# Altium PCB FPGA_Peripheral_Board.PcbDoc (part 5 of 5)
Units mm, origin at the board's own origin, x right, y up, seen from the top; angles counter-clockwise.
Board outline 78.8 x 69 mm, 4 copper layers (Top Layer, Int1 (GND), Int2 (PWR), Bottom Layer), stack 1.508 mm thick; 111 components, 280 nets, 1262 pads, 728 vias.
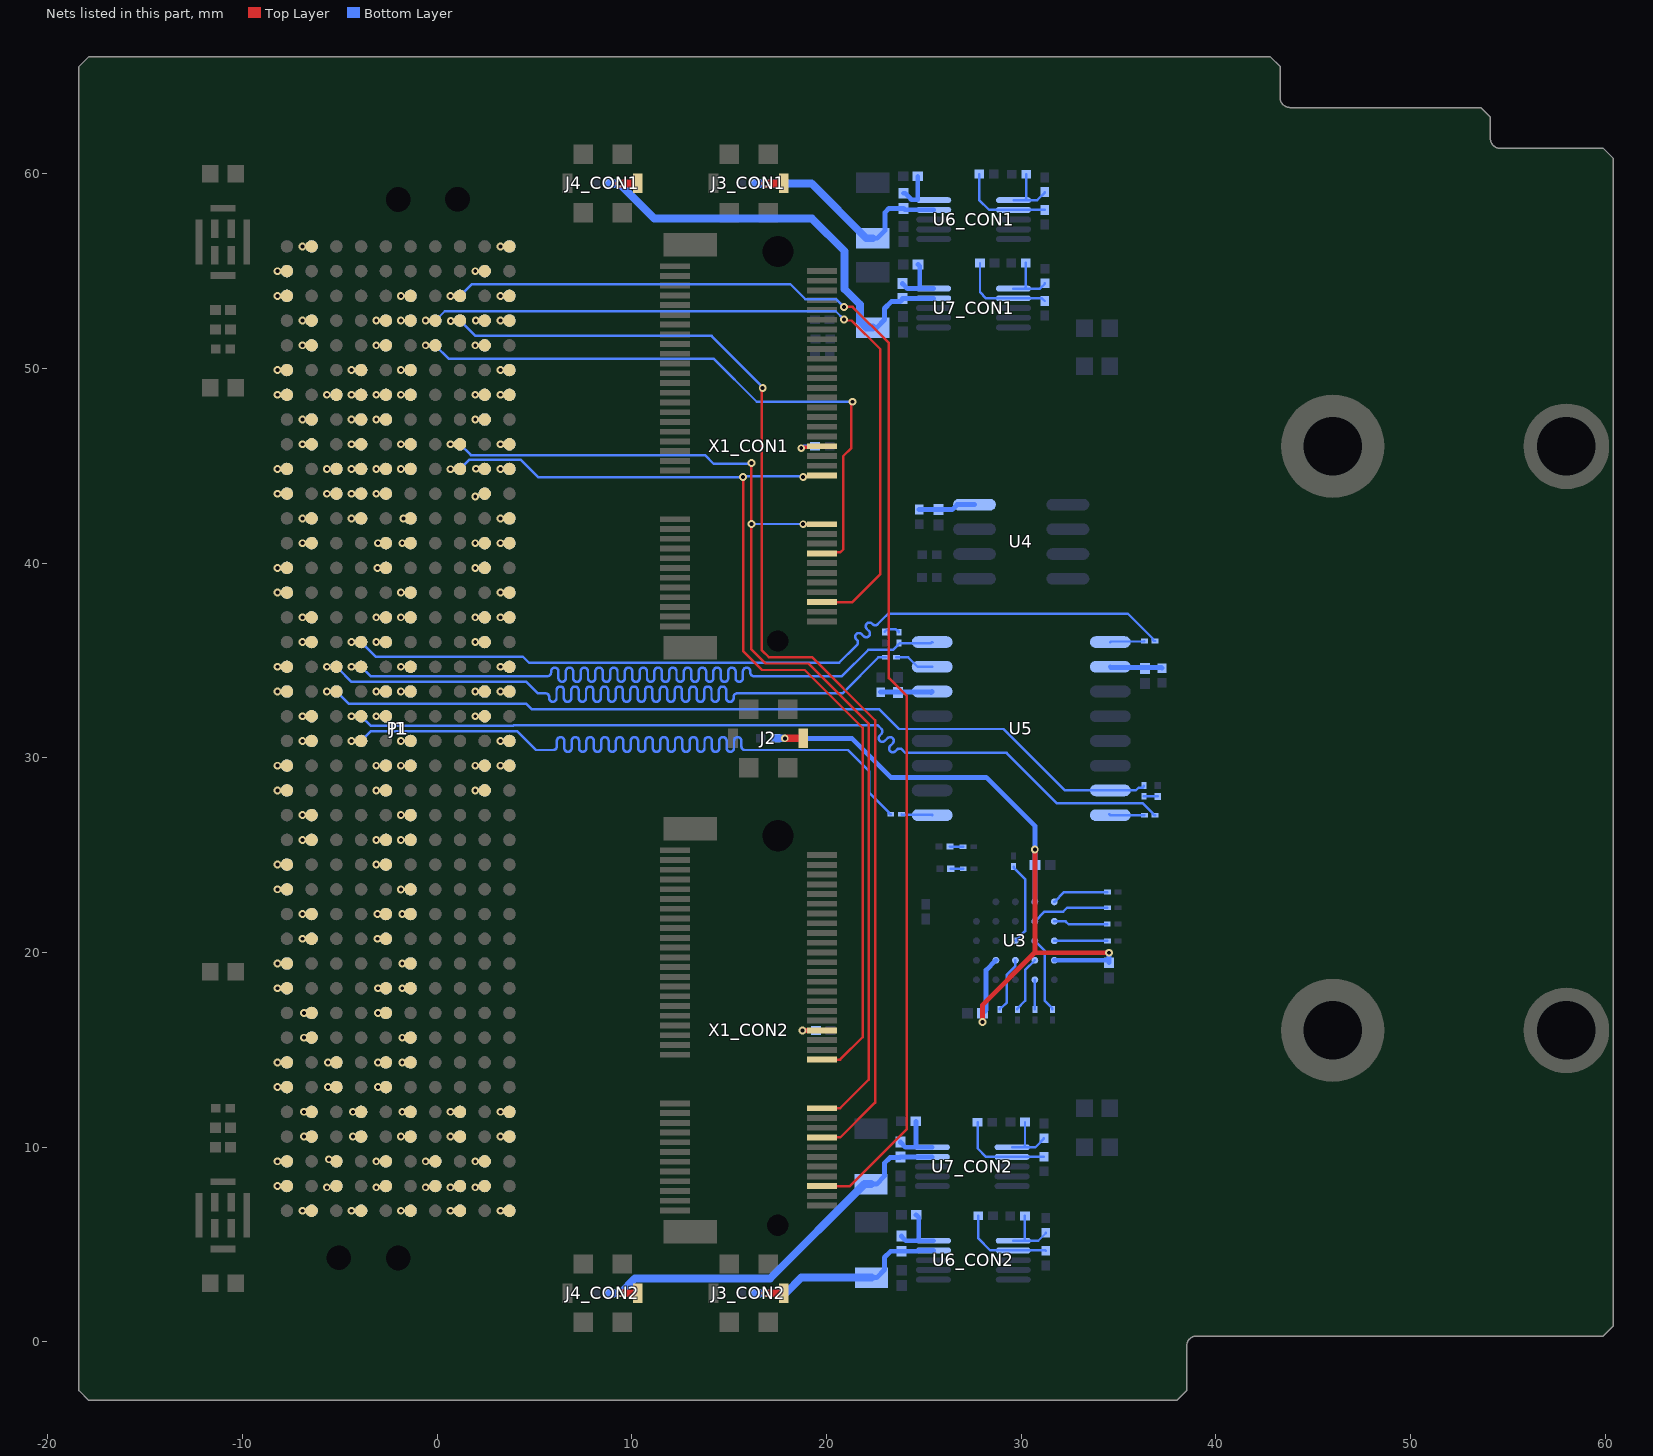
[diagram p6: the nets of this part, all layers, seen from the top]

## Via types
v1: diameter 0.4, hole 0.2, Top Layer to Bottom Layer, tented both sides, 713 vias
v2: diameter 3.5, hole 2.2, Top Layer to Bottom Layer, 11 vias
v3: diameter 5, hole 2.7, Top Layer to Bottom Layer, tented both sides, 2 vias
v4: diameter 3, hole 2.7, Top Layer to Bottom Layer, 1 vias
v5: diameter 3, hole 2.7, Top Layer to Bottom Layer, tented both sides, 1 vias

## Nets (pads, with @x,y where several pads share a name; then routed paths per layer and width w, separated by ;. In a path a pad name is that pad's centre, name@x,y a point inside that pad or via, vN(x,y) a via of type N, cw(c..) or ccw(c..) an arc to the next point about the centre after c; other vN are vias at no path point) (continued)
NetC5_2: C5.2 C6.2 C7.2 J2.1 R8.1 U3.B4 U3.D1 U3.E4 | length 40.5
  Top Layer w0.25: v1(28.016,16.426) 28.016,17.316 30.7,20 ; v1(30.7,25.295) 30.7,20 ; v1(34.502,19.99) 30.71,19.99 30.7,20
  Top Layer w0.4: v1(17.858,31) J2.1@18.8,31
  Bottom Layer w0.25: v1(17.858,31) 21.3,31 23.305,28.995 28.205,28.995 30.7,26.5 v1(30.7,25.295) U3.D1@30.7,22.6 ; v1(28.016,16.426) C5.2@28.016,16.881 ; C5.2@28.125,16.969 28.193,17.037 28.193,19.093 U3.B4@28.7,19.6 ; U3.E4@31.7,19.6 C7.2@34.502,19.6 ; C7.2@34.502,19.473 C7.2@34.502,19.6 ; v1(34.502,19.99) C7.2@34.502,19.6
  Bottom Layer w0.4: R8.1@17.375,31 v1(17.858,31)
NetC8_2: C8.2 R9.1 U4.8 | length 2.9
  Bottom Layer w0.25: R9.1@24.757,42.748 26.448,42.748 26.705,43.005 U4.8@27.6,43.005
NetC9_2: C9.2 R10.1 U5.2 | length 2.7
  Bottom Layer w0.25: U5.2@34.575,34.675 34.611,34.639 37.199,34.639 R10.1@37.235,34.604
NetC10_2: C10.2 R11.1 U5.14 | length 2.7
  Bottom Layer w0.25: R11.1@22.78,33.373 22.795,33.389 U5.14@25.409,33.389 ; U5.14@25.358,33.338 U5.14@25.409,33.389 ; U5.14@25.425,33.405 U5.14@25.409,33.389
NetC13_CON1_1: C13_CON1.1 J3_CON1.2 R13_CON1.2 R15_CON1.2 U6_CON1.9 | length 12.4
  Top Layer w0.4: v1(16.867,59.5) J3_CON1.2@17.8,59.5
  Bottom Layer w0.25: R15_CON1.2@22.373,56.686 22.607,56.686 23.007,57.086 23.007,58.014 23.21,58.216 C13_CON1.1@23.954,58.216 24.019,58.152 25.497,58.152 U6_CON1.9@25.506,58.143
  Bottom Layer w0.4: R13_CON1.2@16.375,59.5 v1(16.867,59.5) 19.234,59.5 22.048,56.686 R15_CON1.2@22.373,56.686
NetC13_CON1_2: C13_CON1.2 R17_CON1.1 U6_CON1.10 | length 2.1
  Bottom Layer w0.25: C13_CON1.2@23.954,58.996 24.042,58.996 24.308,58.73 24.308,58.721 24.366,58.662 24.685,58.662 R17_CON1.1@24.685,59.864
NetC13_CON2_1: C13_CON2.1 J3_CON2.2 R13_CON2.2 R15_CON2.2 U6_CON2.9 | length 11.3
  Top Layer w0.4: v1(16.854,2.5) J3_CON2.2@17.8,2.5
  Bottom Layer w0.25: R15_CON2.2@22.315,3.304 22.578,3.304 22.978,3.704 22.978,4.341 23.293,4.656 24.687,4.656 24.728,4.697 U6_CON2.9@25.492,4.697
  Bottom Layer w0.4: R13_CON2.2@16.375,2.5 v1(16.854,2.5) 17.9,2.5 18.704,3.304 R15_CON2.2@22.315,3.304
NetC13_CON2_2: C13_CON2.2 R17_CON2.1 U6_CON2.10 | length 3.2
  Bottom Layer w0.25: C13_CON2.2@23.847,5.436 23.847,5.416 24.066,5.197 U6_CON2.10@24.757,5.197 ; R17_CON2.1@24.602,6.524 24.609,6.524 24.734,6.399 24.734,5.22 U6_CON2.10@24.757,5.197 ; U6_CON2.10@25.492,5.197 U6_CON2.10@24.757,5.197
NetC14_CON1_1: C14_CON1.1 J4_CON1.2 R14_CON1.2 R16_CON1.2 U7_CON1.9 | length 23.3
  Top Layer w0.4: v1(9.355,59.5) J4_CON1.2@10.3,59.5
  Bottom Layer w0.25: R16_CON1.2@22.374,52.097 22.576,52.097 22.976,52.497 22.976,53.076 23.33,53.43 23.772,53.43 23.907,53.565 C14_CON1.1@23.907,53.585 23.915,53.592 25.492,53.592 U7_CON1.9@25.5,53.6
  Bottom Layer w0.4: R14_CON1.2@8.875,59.5 v1(9.355,59.5) 11.155,57.7 19.246,57.7 20.93,56.016 20.93,54.07 21.724,53.276 21.724,52.422 22.049,52.097 R16_CON1.2@22.374,52.097
NetC14_CON1_2: C14_CON1.2 R18_CON1.1 U7_CON1.10 | length 3
  Bottom Layer w0.25: C14_CON1.2@23.907,54.365 23.907,54.345 24.152,54.1 U7_CON1.10@24.81,54.1 ; R18_CON1.1@24.698,55.342 24.786,55.254 24.786,54.123 U7_CON1.10@24.81,54.1 ; U7_CON1.10@25.5,54.1 U7_CON1.10@24.81,54.1
NetC14_CON2_1: C14_CON2.1 J4_CON2.2 R14_CON2.2 R16_CON2.2 U7_CON2.9 | length 20.8
  Top Layer w0.4: v1(9.4,2.5) J4_CON2.2@10.3,2.5
  Bottom Layer w0.25: R16_CON2.2@22.278,8.107 22.575,8.107 22.975,8.507 22.975,9.181 23.262,9.468 23.782,9.468 23.809,9.495 25.426,9.495 U7_CON2.9@25.432,9.5
  Bottom Layer w0.4: R14_CON2.2@8.875,2.5 v1(9.4,2.5) 10.16,3.26 17.107,3.26 21.953,8.107 R16_CON2.2@22.278,8.107
NetC14_CON2_2: C14_CON2.2 R18_CON2.1 U7_CON2.10 | length 3.1
  Bottom Layer w0.25: C14_CON2.2@23.803,10.269 23.803,10.249 24.052,10 U7_CON2.10@25.432,10 ; R18_CON2.1@24.589,11.326 24.589,10.077 U7_CON2.10@24.653,10.013
NetC23_1: C23.1 R39.2 | length 0.7
  Bottom Layer w0.125: C23.1@26.338,25.443 26.343,25.438 27.009,25.438 R39.2@27.014,25.433
NetC24_1: C24.1 R40.2 | length 0.6
  Bottom Layer w0.125: C24.1@26.38,24.3 R40.2@27.025,24.3
NetC25_1: C25.1 R42.2 | length 0.7
  Bottom Layer w0.125: R42.2@36.3,28.025 36.302,28.023 37.01,28.023 C25.1@37.011,28.021
NetC26_1: C26.1 R43.2 | length 0.9
  Bottom Layer w0.125: C26.1@22.997,36.461 22.997,36.481 23.095,36.579 23.147,36.579 23.168,36.6 23.564,36.6 23.602,36.562 23.652,36.562 23.715,36.499 R43.2@23.715,36.449
NetJ1_A2: J1.A2 P1.A2
  other v1: -8.2,8.005
NetJ1_A3: J1.A3 P1.A3
  other v1: -8.2,9.275
NetJ1_A6: J1.A6 P1.A6
  other v1: -8.2,13.085
NetJ1_A7: J1.A7 P1.A7
  other v1: -8.2,14.355
NetJ1_A10: J1.A10 P1.A10
  other v1: -8.2,18.165
NetJ1_A11: J1.A11 P1.A11
  other v1: -8.2,19.435
NetJ1_A14: J1.A14 P1.A14
  other v1: -8.2,23.245
NetJ1_A15: J1.A15 P1.A15
  other v1: -8.2,24.515
NetJ1_A18: J1.A18 P1.A18
  other v1: -8.2,28.325
NetJ1_A19: J1.A19 P1.A19
  other v1: -8.2,29.595
NetJ1_A22: J1.A22 P1.A22
  other v1: -8.2,33.405
NetJ1_A23: J1.A23 P1.A23
  other v1: -8.2,34.675
NetJ1_A26: J1.A26 P1.A26
  other v1: -8.2,38.485
NetJ1_A27: J1.A27 P1.A27
  other v1: -8.2,39.755
NetJ1_A30: J1.A30 P1.A30
  other v1: -8.2,43.565
NetJ1_A31: J1.A31 P1.A31
  other v1: -8.2,44.835
NetJ1_A34: J1.A34 P1.A34
  other v1: -8.2,48.645
NetJ1_A35: J1.A35 P1.A35
  other v1: -8.2,49.915
NetJ1_A38: J1.A38 P1.A38
  other v1: -8.2,53.725
NetJ1_A39: J1.A39 P1.A39
  other v1: -8.2,54.995
NetJ1_B1: J1.B1 P1.B1
  other v1: -6.92,6.735
NetJ1_B4: J1.B4 P1.B4
  other v1: -6.837,10.545
NetJ1_B5: J1.B5 P1.B5
  other v1: -6.837,11.815
NetJ1_B8: J1.B8 P1.B8
  other v1: -6.837,15.625
NetJ1_B9: J1.B9 P1.B9
  other v1: -6.837,16.895
NetJ1_B12: J1.B12 P1.B12
  other v1: -6.92,20.705
NetJ1_B13: J1.B13 P1.B13
  other v1: -6.92,21.975
NetJ1_B16: J1.B16 P1.B16
  other v1: -6.92,25.785
NetJ1_B17: J1.B17 P1.B17
  other v1: -6.92,27.055
NetJ1_B20: J1.B20 P1.B20
  other v1: -6.92,30.865
NetJ1_B21: J1.B21 P1.B21
  other v1: -6.92,32.135
NetJ1_B24: J1.B24 P1.B24
  other v1: -6.92,35.945
NetJ1_B25: J1.B25 P1.B25
  other v1: -6.92,37.215
NetJ1_B28: J1.B28 P1.B28
  other v1: -6.92,41.025
NetJ1_B29: J1.B29 P1.B29
  other v1: -6.92,42.295
NetJ1_B32: J1.B32 P1.B32
  other v1: -6.92,46.105
NetJ1_B33: J1.B33 P1.B33
  other v1: -6.92,47.375
NetJ1_B36: J1.B36 P1.B36
  other v1: -6.92,51.185
NetJ1_B37: J1.B37 P1.B37
  other v1: -6.92,52.455
NetJ1_B40: J1.B40 P1.B40
  other v1: -6.92,56.265
NetJ1_C2: J1.C2 P1.C2
  other v1: -5.665,7.938
NetJ1_C3: J1.C3 P1.C3
  other v1: -5.564,9.376
NetJ1_C6: J1.C6 P1.C6
  other v1: -5.6,13.085
NetJ1_C7: J1.C7 P1.C7
  other v1: -5.6,14.355
NetJ1_C30: J1.C30 P1.C30
  other v1: -5.665,43.565
NetJ1_C31: J1.C31 P1.C31
  other v1: -5.665,44.835
NetJ1_C34: J1.C34 P1.C34
  other v1: -5.665,48.645
NetJ1_D1: J1.D1 P1.D1
  other v1: -4.395,6.735
NetJ1_D4: J1.D4 P1.D4
  other v1: -4.33,10.545
NetJ1_D5: J1.D5 P1.D5
  other v1: -4.33,11.815
NetJ1_D29: J1.D29 P1.D29
  other v1: -4.395,42.295
NetJ1_D30: J1.D30 P1.D30
  other v1: -4.395,43.565
NetJ1_D31: J1.D31 P1.D31
  other v1: -4.395,44.835
NetJ1_D32: J1.D32 P1.D32
  other v1: -4.395,46.105
NetJ1_D33: J1.D33 P1.D33
  other v1: -4.395,47.375
NetJ1_D34: J1.D34 P1.D34
  other v1: -4.395,48.645
NetJ1_D35: J1.D35 P1.D35
  other v1: -4.395,49.915
NetJ1_E2: J1.E2 P1.E2
  other v1: -3.126,7.938
NetJ1_E3: J1.E3 P1.E3
  other v1: -3.126,9.275
NetJ1_E6: J1.E6 P1.E6
  other v1: -3.037,13.085
NetJ1_E7: J1.E7 P1.E7
  other v1: -3.037,14.355
NetJ1_E9: J1.E9 P1.E9
  other v1: -3.037,16.895
NetJ1_E10: J1.E10 P1.E10
  other v1: -3.037,18.165
NetJ1_E12: J1.E12 P1.E12
  other v1: -3.06,20.705
NetJ1_E13: J1.E13 P1.E13
  other v1: -3.06,21.975
NetJ1_E15: J1.E15 P1.E15
  other v1: -3.126,24.515
NetJ1_E16: J1.E16 P1.E16
  other v1: -3.126,25.785
NetJ1_E18: J1.E18 P1.E18
  other v1: -3.126,28.325
NetJ1_E19: J1.E19 P1.E19
  other v1: -3.126,29.595
NetJ1_E21: J1.E21 P1.E21
  other v1: -3.126,32.135
NetJ1_E22: J1.E22 P1.E22
  other v1: -3.126,33.405
NetJ1_E24: J1.E24 P1.E24
  other v1: -3.126,35.945
NetJ1_E25: J1.E25 P1.E25
  other v1: -3.126,37.215
NetJ1_E27: J1.E27 P1.E27
  other v1: -3.06,39.755
NetJ1_E28: J1.E28 P1.E28
  other v1: -3.037,41.025
NetJ1_E30: J1.E30 P1.E30
  other v1: -3.126,43.565
NetJ1_E31: J1.E31 P1.E31
  other v1: -3.126,44.835
NetJ1_E33: J1.E33 P1.E33
  other v1: -3.126,47.375
NetJ1_E34: J1.E34 P1.E34
  other v1: -3.126,48.645
NetJ1_E36: J1.E36 P1.E36
  other v1: -3.126,51.185
NetJ1_E37: J1.E37 P1.E37
  other v1: -3.126,52.455
NetJ1_F1: J1.F1 P1.F1
  other v1: -1.865,6.735
NetJ1_F4: J1.F4 P1.F4
  other v1: -1.865,10.545
NetJ1_F5: J1.F5 P1.F5
  other v1: -1.79,11.815
NetJ1_F7: J1.F7 P1.F7
  other v1: -1.79,14.355
NetJ1_F8: J1.F8 P1.F8
  other v1: -1.79,15.625
NetJ1_F10: J1.F10 P1.F10
  other v1: -1.79,18.165
NetJ1_F11: J1.F11 P1.F11
  other v1: -1.79,19.435
NetJ1_F13: J1.F13 P1.F13
  other v1: -1.79,21.975
NetJ1_F14: J1.F14 P1.F14
  other v1: -1.865,23.237
NetJ1_F16: J1.F16 P1.F16
  other v1: -1.865,25.785
NetJ1_F17: J1.F17 P1.F17
  other v1: -1.865,27.055
NetJ1_F19: J1.F19 P1.F19
  other v1: -1.865,29.595
NetJ1_F20: J1.F20 P1.F20
  other v1: -1.865,30.865
NetJ1_F22: J1.F22 P1.F22
  other v1: -1.865,33.405
NetJ1_F23: J1.F23 P1.F23
  other v1: -1.865,34.675
NetJ1_F25: J1.F25 P1.F25
  other v1: -1.865,37.215
NetJ1_F26: J1.F26 P1.F26
  other v1: -1.865,38.485
NetJ1_F28: J1.F28 P1.F28
  other v1: -1.79,41.025
NetJ1_F29: J1.F29 P1.F29
  other v1: -1.737,42.295
NetJ1_F31: J1.F31 P1.F31
  other v1: -1.865,44.835
NetJ1_F32: J1.F32 P1.F32
  other v1: -1.865,46.105
NetJ1_F34: J1.F34 P1.F34
  other v1: -1.865,48.645
NetJ1_F35: J1.F35 P1.F35
  other v1: -1.865,49.915
NetJ1_F37: J1.F37 P1.F37
  other v1: -1.865,52.455
NetJ1_F38: J1.F38 P1.F38
  other v1: -1.865,53.725
NetJ1_G2: J1.G2 P1.G2
  other v1: -0.59,7.938
NetJ1_G3: J1.G3 P1.G3
  other v1: -0.59,9.275
NetJ1_H1: J1.H1 P1.H1
  other v1: 0.68,6.735
NetJ1_H2: J1.H2 P1.H2
  other v1: 0.68,7.938
NetJ1_H4: J1.H4 P1.H4
  other v1: 0.68,10.545
NetJ1_H5: J1.H5 P1.H5
  other v1: 0.68,11.815
NetJ1_J2: J1.J2 P1.J2
  other v1: 1.96,7.938
NetJ1_J3: J1.J3 P1.J3
  other v1: 1.96,9.275
NetJ1_J18: J1.J18 P1.J18
  other v1: 1.96,28.325
NetJ1_J19: J1.J19 P1.J19
  other v1: 1.96,29.595
NetJ1_J21: J1.J21 P1.J21
  other v1: 1.96,32.135
NetJ1_J22: J1.J22 P1.J22
  other v1: 1.96,33.405
NetJ1_J24: J1.J24 P1.J24
  other v1: 1.96,35.945
NetJ1_J25: J1.J25 P1.J25
  other v1: 1.96,37.215
NetJ1_J27: J1.J27 P1.J27
  other v1: 1.96,39.755
NetJ1_J28: J1.J28 P1.J28
  other v1: 1.96,41.025
NetJ1_J30: J1.J30 P1.J30
  other v1: 1.96,43.422
NetJ1_J31: J1.J31 P1.J31
  other v1: 1.989,44.844
NetJ1_J33: J1.J33 P1.J33
  other v1: 1.96,47.375
NetJ1_J34: J1.J34 P1.J34
  other v1: 1.96,48.645
NetJ1_J36: J1.J36 P1.J36
  other v1: 1.96,51.185
NetJ1_J37: J1.J37 P1.J37
  other v1: 1.985,52.458
NetJ1_J39: J1.J39 P1.J39
  other v1: 1.96,54.995
NetJ1_K1: J1.K1 P1.K1
  other v1: 3.25,6.735
NetJ1_K4: J1.K4 P1.K4
  other v1: 3.25,10.545
NetJ1_K5: J1.K5 P1.K5
  other v1: 3.25,11.815
NetJ1_K19: J1.K19 P1.K19
  other v1: 3.25,29.595
NetJ1_K20: J1.K20 P1.K20
  other v1: 3.25,30.865
NetJ1_K22: J1.K22 P1.K22
  other v1: 3.25,33.405
NetJ1_K23: J1.K23 P1.K23
  other v1: 3.25,34.675
NetJ1_K25: J1.K25 P1.K25
  other v1: 3.25,37.215
NetJ1_K26: J1.K26 P1.K26
  other v1: 3.25,38.485
NetJ1_K28: J1.K28 P1.K28
  other v1: 3.25,41.025
NetJ1_K29: J1.K29 P1.K29
  other v1: 3.25,42.295
NetJ1_K31: J1.K31 P1.K31
  other v1: 3.25,44.835
NetJ1_K32: J1.K32 P1.K32
  other v1: 3.25,46.105
NetJ1_K34: J1.K34 P1.K34
  other v1: 3.25,48.645
NetJ1_K35: J1.K35 P1.K35
  other v1: 3.25,49.915
NetJ1_K37: J1.K37 P1.K37
  other v1: 3.25,52.455
NetJ1_K38: J1.K38 P1.K38
  other v1: 3.25,53.725
NetJ1_K40: J1.K40 P1.K40
  other v1: 3.25,56.265
NetR12_CON1_1: R12_CON1.1 X1_CON1.38 | length 1.9
  Top Layer w0.2: v1(18.7,45.903) 18.754,45.903 18.801,45.95 19.725,45.95 X1_CON1.38@19.775,46
  Bottom Layer w0.2: v1(18.7,45.903) 18.754,45.903 18.851,46 R12_CON1.1@19.409,46
NetR12_CON2_1: R12_CON2.1 X1_CON2.38 | length 1.7
  Top Layer w0.25: v1(18.762,16) X1_CON2.38@19.775,16
  Bottom Layer w0.25: v1(18.762,16) R12_CON2.1@19.455,16
NetR19_CON1_2: R19_CON1.2 R23.2 U6_CON1.2 | length 4.9
  Bottom Layer w0.125: R19_CON1.2@27.84,59.982 27.84,58.658 28.355,58.143 U6_CON1.2@29.606,58.143 31.208,58.143 R23.2@31.214,58.137
NetR19_CON2_2: R19_CON2.2 R27.2 U6_CON2.2 | length 4.9
  Bottom Layer w0.125: R19_CON2.2@27.797,6.476 27.797,5.311 28.412,4.697 U6_CON2.2@29.592,4.697 31.243,4.697 R27.2@31.262,4.678
NetR20_CON1_2: R20_CON1.2 R24.2 U6_CON1.1 | length 3.2
  Bottom Layer w0.125: U6_CON1.1@29.606,58.643 U6_CON1.1@30.178,58.643 ; R20_CON1.2@30.259,59.976 30.259,58.723 U6_CON1.1@30.178,58.643 ; R24.2@31.214,59.058 31.214,59.033 30.823,58.643 U6_CON1.1@30.178,58.643
NetR20_CON2_2: R20_CON2.2 R28.2 U6_CON2.1 | length 3.2
  Bottom Layer w0.125: U6_CON2.1@29.592,5.197 U6_CON2.1@30.111,5.197 ; R20_CON2.2@30.192,6.472 30.192,5.278 U6_CON2.1@30.111,5.197 ; R28.2@31.262,5.608 31.262,5.583 30.875,5.197 U6_CON2.1@30.111,5.197
NetR21_CON1_2: R21_CON1.2 R25.2 U7_CON1.2 | length 5
  Bottom Layer w0.125: R21_CON1.2@27.881,55.413 27.881,53.919 28.2,53.6 U7_CON1.2@29.6,53.6 31.068,53.6 R25.2@31.206,53.462
NetR21_CON2_2: R21_CON2.2 R29.2 U7_CON2.2 | length 4.9
  Bottom Layer w0.125: R21_CON2.2@27.758,11.287 27.758,9.942 28.2,9.5 U7_CON2.2@29.532,9.5 31.154,9.5 R29.2@31.166,9.512
NetR22_CON1_2: R22_CON1.2 R26.2 U7_CON1.1 | length 3.1
  Bottom Layer w0.125: U7_CON1.1@29.6,54.1 U7_CON1.1@30.153,54.1 ; R22_CON1.2@30.234,55.42 30.234,54.181 U7_CON1.1@30.153,54.1 ; R26.2@31.215,54.375 31.215,54.35 30.965,54.1 U7_CON1.1@30.153,54.1
NetR22_CON2_2: R22_CON2.2 R30.2 U7_CON2.1 | length 3.2
  Bottom Layer w0.125: U7_CON2.1@29.532,10 U7_CON2.1@30.113,10 ; R22_CON2.2@30.194,11.294 30.194,10.081 U7_CON2.1@30.113,10 ; R30.2@31.166,10.465 31.166,10.44 30.726,10 U7_CON2.1@30.113,10
NetR31_2: R31.2 U3.D3 | length 3.9
  Bottom Layer w0.125: U3.D3@30.7,20.6 31.215,20.085 31.215,17.51 31.6,17.125 R31.2@31.6,17.075
NetR33_2: R33.2 U3.D2 | length 4
  Bottom Layer w0.125: U3.D2@30.7,21.6 31.2,22.1 32.16,22.1 32.36,22.3 R33.2@34.425,22.3
NetR34_2: R34.2 U3.C4 | length 2.9
  Bottom Layer w0.125: R34.2@28.9,17.075 28.9,17.125 28.962,17.187 29.012,17.187 29.263,17.437 29.263,18.867 29.7,19.304 U3.C4@29.7,19.6
NetR35_2: R35.2 U3.D4 | length 2.9
  Bottom Layer w0.125: R35.2@29.8,17.075 29.8,17.125 30.2,17.525 30.2,19.1 U3.D4@30.7,19.6
NetR36_2: R36.2 U3.D5 | length 1.5
  Bottom Layer w0.125: R36.2@30.7,17.075 U3.D5@30.7,18.6
NetR37_2: R37.2 U3.E3 | length 2.7
  Bottom Layer w0.125: U3.E3@31.7,20.6 R37.2@34.425,20.6
NetR38_2: R38.2 U3.E2 | length 2.8
  Bottom Layer w0.125: U3.E2@31.7,21.6 32.282,21.6 32.434,21.448 34.408,21.448 R38.2@34.42,21.461
NetR41_2: R41.2 U3.E1 | length 2.9
  Bottom Layer w0.125: U3.E1@31.7,22.6 32.2,23.1 R41.2@34.425,23.1
NetR44_1: R44.1 U5.15 | length 2.1
  Bottom Layer w0.125: R44.1@23.586,35.162 24.188,35.162 24.675,34.675 U5.15@25.425,34.675 U5.15@25.432,34.668
NetR45_1: R45.1 U5.8 | length 1.8
  Bottom Layer w0.125: U5.8@34.525,27.105 U5.8@34.575,27.055 34.576,27.054 R45.1@36.325,27.052 R45.1@36.325,27.052
NetR46_1: R46.1 U5.9 | length 1.6
  Bottom Layer w0.125: R46.1@23.85,27.1 23.872,27.077 25.403,27.077 U5.9@25.425,27.055 U5.9@25.438,27.068
NetR47_1: R47.1 U5.1 | length 1.8
  Bottom Layer w0.125: U5.1@34.575,35.945 34.602,35.972 36.297,35.972 R47.1@36.325,36
NetR48_2: R48.2 U3.C3 | length 4.3
  Bottom Layer w0.125: R48.2@29.607,24.414 29.607,24.364 30.2,23.771 30.2,21.1 U3.C3@29.7,20.6
nLED1_CON1: J1.G37 P1.G37 X1_CON1.6 | length 39
  Top Layer w0.125: X1_CON1.6@19.775,38 21.325,38 22.764,39.438 22.764,50.986 21.29,52.46 20.95,52.46 v1(20.903,52.507)
  Bottom Layer w0.125: P1.G37@-0.095,52.455 0.387,52.937 20.472,52.937 v1(20.903,52.507)
  other v1: -0.59,52.455
nLED1_CON2: J1.H38 P1.H38 X1_CON2.6 | length 69.9
  Top Layer w0.125: X1_CON2.6@19.775,8 21.2,8 24.129,10.929 24.129,33.171 23.204,34.096 23.204,51.296 21.342,53.158 v1(20.892,53.158)
  Bottom Layer w0.125: P1.H38@1.175,53.725 1.782,54.332 18.136,54.332 18.91,53.557 20.492,53.557 v1(20.892,53.158)
  other v1: 0.68,53.725
nLED2_CON1: J1.G36 P1.G36 X1_CON1.16 | length 31.6
  Top Layer w0.125: X1_CON1.16@19.775,40.5 19.822,40.547 20.701,40.547 20.858,40.704 20.858,45.495 21.279,45.916 21.279,48.234 v1(21.331,48.286)
  Bottom Layer w0.125: P1.G36@-0.095,51.185 0.59,50.5 14.2,50.5 16.414,48.286 v1(21.331,48.286)
  other v1: -0.59,51.185
nLED2_CON2: J1.H37 P1.H37 X1_CON2.16 | length 60.9
  Top Layer w0.125: v1(16.719,48.993) 16.683,48.956 16.683,35.519 17.031,35.171 19.252,35.171 22.496,31.927 22.496,12.288 20.707,10.5 X1_CON2.16@19.775,10.5
  Bottom Layer w0.125: P1.H37@1.175,52.455 1.962,51.667 14.099,51.667 16.719,49.047 v1(16.719,48.993)
  other v1: 0.7,52.435
QSPI_IO0: J1.C23 P1.C23 R44.2 | length 45.1
  Bottom Layer w0.125: P1.C23@-5.175,34.675 -5.175,34.575 -5.075,34.575 -4.4,33.9 4.585,33.9 5.148,33.338 5.174,33.312 5.563,33.312 cw(c5.563,33.122) 5.752,33.122 5.752,33.064 ccw(c5.942,33.064) 5.942,32.874 ccw(c5.942,33.064) 6.131,33.064 6.131,33.472 cw(c6.321,33.472) 6.321,33.661 cw(c6.321,33.472) 6.51,33.472 6.51,33.064 ccw(c6.7,33.064) 6.7,32.874 ccw(c6.7,33.064) 6.889,33.064 6.889,33.472 cw(c7.079,33.472) 7.079,33.661 cw(c7.079,33.472) 7.268,33.472 7.268,33.064 ccw(c7.458,33.064) 7.458,32.874 ; 7.458,32.874 ccw(c7.458,33.064) 7.647,33.064 7.647,33.472 cw(c7.837,33.472) 7.837,33.661 cw(c7.837,33.472) 8.026,33.472 8.026,33.064 ccw(c8.216,33.064) 8.216,32.874 ccw(c8.216,33.064) 8.405,33.064 8.405,33.472 cw(c8.595,33.472) 8.595,33.661 cw(c8.595,33.472) 8.784,33.472 8.784,33.064 ccw(c8.974,33.064) 8.974,32.874 ccw(c8.974,33.064) 9.163,33.064 9.163,33.472 cw(c9.353,33.472) 9.353,33.661 cw(c9.353,33.472) 9.542,33.472 9.542,33.064 ccw(c9.732,33.064) 9.732,32.874 ccw(c9.732,33.064) 9.921,33.064 9.921,33.472 cw(c10.111,33.472) 10.111,33.661 cw(c10.111,33.472) 10.3,33.472 10.3,33.064 ccw(c10.49,33.064) 10.49,32.874 ccw(c10.49,33.064) 10.679,33.064 10.679,33.472 cw(c10.869,33.472) 10.869,33.661 cw(c10.869,33.472) 11.058,33.472 11.058,33.064 ccw(c11.248,33.064) 11.248,32.874 ccw(c11.248,33.064) 11.437,33.064 11.437,33.472 cw(c11.627,33.472) 11.627,33.661 cw(c11.627,33.472) 11.816,33.472 11.816,33.064 ccw(c12.006,33.064) 12.006,32.874 ccw(c12.006,33.064) 12.195,33.064 12.195,33.472 cw(c12.385,33.472) 12.385,33.661 cw(c12.385,33.472) 12.574,33.472 12.574,33.064 ccw(c12.764,33.064) 12.764,32.874 ccw(c12.764,33.064) 12.953,33.064 12.953,33.472 cw(c13.143,33.472) 13.143,33.661 cw(c13.143,33.472) 13.332,33.472 13.332,33.064 ccw(c13.522,33.064) 13.522,32.874 ccw(c13.522,33.064) 13.711,33.064 13.711,33.472 cw(c13.901,33.472) 13.901,33.661 cw(c13.901,33.472) 14.09,33.472 14.09,33.064 ccw(c14.28,33.064) 14.28,32.874 ccw(c14.28,33.064) 14.469,33.064 14.469,33.472 cw(c14.659,33.472) 14.659,33.661 cw(c14.659,33.472) 14.848,33.472 14.848,33.064 ccw(c15.038,33.064) 15.038,32.874 ccw(c15.038,33.064) 15.227,33.064 15.227,33.122 cw(c15.417,33.122) 15.417,33.312 15.479,33.312 20.812,33.312 22.662,35.162 R44.2@23.036,35.162
  other v1: -5.665,34.675
QSPI_IO1: J1.D21 P1.D21 R45.2 | length 44.4
  Bottom Layer w0.125: P1.D21@-3.905,32.135 -3.423,31.652 3.915,31.652 3.927,31.664 22.495,31.664 22.636,31.664 22.811,31.489 cw(c22.677,31.355) 22.811,31.221 22.733,31.144 ccw(c22.867,31.01) 22.733,30.876 ccw(c22.867,31.01) 23.001,30.876 23.132,31.007 cw(c23.266,30.873) 23.4,31.007 cw(c23.266,30.873) 23.4,30.739 23.269,30.608 ccw(c23.403,30.474) 23.269,30.34 ccw(c23.403,30.474) 23.537,30.34 23.615,30.417 cw(c23.749,30.283) 23.883,30.417 24.044,30.256 24.051,30.249 24.125,30.249 29.251,30.249 31.84,27.66 36.248,27.66 36.663,27.245 36.763,27.145 36.763,27.115 36.825,27.052 R45.2@36.875,27.052
  other v1: -4.395,32.135
QSPI_IO2: J1.D20 P1.D20 R46.2 | length 45.1
  Bottom Layer w0.125: P1.D20@-3.905,30.865 -3.402,31.368 4.101,31.368 5.068,30.4 5.9,30.4 5.963,30.4 ccw(c5.963,30.589) 6.152,30.589 6.152,30.875 cw(c6.342,30.875) 6.342,31.065 cw(c6.342,30.875) 6.531,30.875 6.531,30.499 ccw(c6.721,30.499) 6.721,30.31 ccw(c6.721,30.499) 6.91,30.499 6.91,30.875 cw(c7.1,30.875) 7.1,31.065 cw(c7.1,30.875) 7.289,30.875 7.289,30.499 ccw(c7.479,30.499) 7.479,30.31 ccw(c7.479,30.499) 7.668,30.499 7.668,30.875 cw(c7.858,30.875) 7.858,31.065 cw(c7.858,30.875) 8.047,30.875 8.047,30.499 ccw(c8.237,30.499) 8.237,30.31 ccw(c8.237,30.499) 8.426,30.499 8.426,30.875 cw(c8.616,30.875) 8.616,31.065 cw(c8.616,30.875) 8.805,30.875 8.805,30.499 ccw(c8.995,30.499) 8.995,30.31 ccw(c8.995,30.499) 9.184,30.499 9.184,30.875 cw(c9.374,30.875) 9.374,31.065 cw(c9.374,30.875) 9.563,30.875 9.563,30.499 ccw(c9.753,30.499) 9.753,30.31 ccw(c9.753,30.499) 9.942,30.499 9.942,30.875 cw(c10.132,30.875) 10.132,31.065 cw(c10.132,30.875) 10.321,30.875 10.321,30.499 ccw(c10.511,30.499) 10.511,30.31 ccw(c10.511,30.499) 10.7,30.499 10.7,30.875 cw(c10.89,30.875) 10.89,31.065 cw(c10.89,30.875) 11.079,30.875 11.079,30.499 ccw(c11.269,30.499) 11.269,30.31 ccw(c11.269,30.499) 11.458,30.499 11.458,30.875 cw(c11.648,30.875) 11.648,31.065 cw(c11.648,30.875) 11.837,30.875 11.837,30.499 ccw(c12.027,30.499) 12.027,30.31 ccw(c12.027,30.499) 12.216,30.499 12.216,30.875 cw(c12.406,30.875) 12.406,31.065 cw(c12.406,30.875) 12.595,30.875 12.595,30.499 ccw(c12.785,30.499) 12.785,30.31 ccw(c12.785,30.499) 12.974,30.499 12.974,30.875 cw(c13.164,30.875) 13.164,31.065 cw(c13.164,30.875) 13.353,30.875 13.353,30.499 ccw(c13.543,30.499) 13.543,30.31 ccw(c13.543,30.499) 13.732,30.499 13.732,30.875 cw(c13.922,30.875) 13.922,31.065 cw(c13.922,30.875) 14.111,30.875 14.111,30.499 ccw(c14.301,30.499) 14.301,30.31 ccw(c14.301,30.499) 14.49,30.499 14.49,30.875 cw(c14.68,30.875) 14.68,31.065 cw(c14.68,30.875) 14.869,30.875 14.869,30.499 ccw(c15.059,30.499) 15.059,30.31 ccw(c15.059,30.499) 15.248,30.499 15.248,30.875 cw(c15.438,30.875) 15.438,31.065 cw(c15.438,30.875) 15.627,30.875 15.627,30.589 ccw(c15.817,30.589) 15.817,30.4 16.164,30.4 21.1,30.4 22.2,29.3 22.2,28.2 23.187,27.212 23.187,27.162 23.25,27.1 R46.2@23.3,27.1
  other v1: -4.395,30.865
QSPI_IO3: J1.D24 P1.D24 R47.2 | length 44.1
  Bottom Layer w0.125: P1.D24@-3.905,35.945 -3.16,35.2 4.4,35.2 4.719,34.881 20.647,34.881 21.513,35.747 21.557,35.791 ccw(c21.423,35.925) 21.557,36.059 21.53,36.086 cw(c21.664,36.22) 21.53,36.354 cw(c21.664,36.22) 21.798,36.354 21.908,36.245 ccw(c22.042,36.379) 22.176,36.245 ccw(c22.042,36.379) 22.176,36.513 22.066,36.622 cw(c22.2,36.756) 22.066,36.89 cw(c22.2,36.756) 22.334,36.89 22.361,36.863 ccw(c22.495,36.997) 22.629,36.863 23.063,37.297 23.166,37.4 35.475,37.4 36.762,36.113 36.762,36.062 36.825,36 R47.2@36.875,36
  other v1: -4.395,35.945
QSPI_nCS: J1.C22 P1.C22 R42.1 U5.7 | length 44.2
  Bottom Layer w0.125: v1(-5.665,33.405) P1.C22@-5.175,33.405 -4.553,32.783 4.57,32.783 4.849,32.504 22.696,32.504 23.72,31.48 29.085,31.48 32.24,28.325 U5.7@34.575,28.325 35.885,28.325 36.023,28.463 36.238,28.463 36.3,28.525 R42.1@36.3,28.575
QSPI_SCK: J1.D23 P1.D23 R43.1 U5.16 | length 45.6
  Bottom Layer w0.125: P1.D23@-3.905,34.675 -3.423,34.192 5.6,34.192 5.663,34.192 ccw(c5.663,34.382) 5.852,34.382 5.852,34.443 cw(c6.042,34.443) 6.042,34.632 cw(c6.042,34.443) 6.231,34.443 6.231,34.091 ccw(c6.421,34.091) 6.421,33.902 ccw(c6.421,34.091) 6.61,34.091 6.61,34.443 cw(c6.8,34.443) 6.8,34.632 cw(c6.8,34.443) 6.989,34.443 6.989,34.091 ccw(c7.179,34.091) 7.179,33.902 ccw(c7.179,34.091) 7.368,34.091 7.368,34.443 cw(c7.558,34.443) 7.558,34.632 cw(c7.558,34.443) 7.747,34.443 7.747,34.091 ccw(c7.937,34.091) 7.937,33.902 ccw(c7.937,34.091) 8.126,34.091 8.126,34.443 cw(c8.316,34.443) 8.316,34.632 cw(c8.316,34.443) 8.505,34.443 8.505,34.091 ccw(c8.695,34.091) 8.695,33.902 ccw(c8.695,34.091) 8.884,34.091 8.884,34.443 cw(c9.074,34.443) 9.074,34.632 cw(c9.074,34.443) 9.263,34.443 9.263,34.091 ccw(c9.453,34.091) 9.453,33.902 ccw(c9.453,34.091) 9.642,34.091 9.642,34.443 cw(c9.832,34.443) 9.832,34.632 cw(c9.832,34.443) 10.021,34.443 10.021,34.091 ccw(c10.211,34.091) 10.211,33.902 ccw(c10.211,34.091) 10.4,34.091 10.4,34.443 cw(c10.59,34.443) 10.59,34.632 cw(c10.59,34.443) 10.779,34.443 10.779,34.091 ccw(c10.969,34.091) 10.969,33.902 ccw(c10.969,34.091) 11.158,34.091 11.158,34.443 cw(c11.348,34.443) 11.348,34.632 cw(c11.348,34.443) 11.537,34.443 11.537,34.091 ccw(c11.727,34.091) 11.727,33.902 ccw(c11.727,34.091) 11.916,34.091 11.916,34.443 cw(c12.106,34.443) 12.106,34.632 cw(c12.106,34.443) 12.295,34.443 12.295,34.091 ccw(c12.485,34.091) 12.485,33.902 ccw(c12.485,34.091) 12.674,34.091 12.674,34.443 cw(c12.864,34.443) 12.864,34.632 cw(c12.864,34.443) 13.053,34.443 13.053,34.091 ccw(c13.243,34.091) 13.243,33.902 ccw(c13.243,34.091) 13.432,34.091 13.432,34.443 cw(c13.622,34.443) 13.622,34.632 cw(c13.622,34.443) 13.811,34.443 13.811,34.091 ccw(c14.001,34.091) 14.001,33.902 ccw(c14.001,34.091) 14.19,34.091 14.19,34.443 cw(c14.38,34.443) 14.38,34.632 cw(c14.38,34.443) 14.569,34.443 14.569,34.091 ccw(c14.759,34.091) 14.759,33.902 ccw(c14.759,34.091) 14.948,34.091 14.948,34.443 cw(c15.138,34.443) 15.138,34.632 cw(c15.138,34.443) 15.327,34.443 15.327,34.091 ccw(c15.517,34.091) 15.517,33.902 ccw(c15.517,34.091) 15.706,34.091 15.706,34.443 cw(c15.896,34.443) 15.896,34.632 cw(c15.896,34.443) 16.085,34.443 16.085,34.382 ccw(c16.275,34.382) 16.275,34.192 17.034,34.192 20.795,34.192 22.142,35.54 23.415,35.54 23.652,35.777 23.652,35.787 23.75,35.885 25.365,35.885 U5.16@25.425,35.945 U5.16@25.448,35.922
  other v1: -4.395,34.675
UART_RX: J1.H31 P1.H31 X1_CON1.32 X1_CON2.32 | length 54.4
  Top Layer w0.125: v1(15.713,44.42) 15.713,35.486 16.689,34.51 18.881,34.51 21.858,31.533 21.858,15.658 20.7,14.5 X1_CON2.32@19.775,14.5 ; v1(18.8,44.421) 18.84,44.46 19.735,44.46 X1_CON1.32@19.775,44.5
  Bottom Layer w0.125: P1.H31@1.175,44.835 1.657,45.317 4.289,45.317 5.205,44.401 15.695,44.401 15.754,44.46 18.761,44.46 v1(18.8,44.421)
  other v1: 0.69,44.825
UART_TX: J1.H32 P1.H32 X1_CON1.22 X1_CON2.22 | length 57.5
  Top Layer w0.125: v1(16.139,45.139) v1(16.139,42.016) 16.139,35.567 16.862,34.844 19.074,34.844 22.162,31.756 22.162,13.462 20.7,12 X1_CON2.22@19.775,12 ; v1(18.8,42) X1_CON1.22@19.775,42
  Bottom Layer w0.125: P1.H32@1.175,46.105 1.73,45.55 13.75,45.55 14.2,45.1 16.101,45.1 v1(16.139,45.139) ; v1(16.139,42.016) 16.147,42.008 18.792,42.008 v1(18.8,42)
  other v1: 0.68,46.105
pads on no net: J1.MH1 J1.MH2 P1.MH1 P1.MH2 U3.A2 U3.A4 U3.A5 U3.B5 U3.C5 U4.1 U4.2 U5.3 U5.4 U5.5 U5.6 U5.11 U5.12 U5.13 X1_CON1. X1_CON1.20 X1_CON1.34 X1_CON1.36 X1_CON1.44 X1_CON1.46 X1_CON1.48 X1_CON1.50 X1_CON1.52 X1_CON1.54 X1_CON1.56 X1_CON1.64 X1_CON1.66 X1_CON1.68 X1_CON1.70 X1_CON2. X1_CON2.20 X1_CON2.34 X1_CON2.36 X1_CON2.44 X1_CON2.46 X1_CON2.48 X1_CON2.50 X1_CON2.52 X1_CON2.54 X1_CON2.56 X1_CON2.64 X1_CON2.66 X1_CON2.68 X1_CON2.70

## Polygon pours and split planes (outlines as drawn)
GND on Bottom Layer "NONET_L-01_P-001" (solid, remove dead copper, pour order 13): -18.4,-3 60.398,-3 60.398,65.994 -18.4,65.994
GND on Bottom Layer "GND_L04_P010" (solid, pour order 10): -13.402,31.494 -13.402,1.994 1.398,1.994 20.602,1.994 55.398,1.994 55.398,31.494 60.398,31.494 60.398,-3.006 -18.402,-3.006 -18.402,31.494
GND on Bottom Layer "GND_L04_P009" (solid, pour order 9): -13.402,31.494 -13.402,60.994 1.398,60.994 20.698,60.994 ccw(c20.65,60.877) 20.602,60.994 55.398,60.994 55.398,31.494 60.398,31.494 60.398,65.994 -18.402,65.994 -18.402,31.494
GND on Bottom Layer "GND_L04_P006" (solid, pour order 6): 52.4,56.8 52.4,61.3 56.2,61.3 56.2,56.8
GND on Top Layer "NONET_L-01_P-001" (solid, remove dead copper, pour order 14): -18.4,-3 60.4,-3 60.4,66 -18.4,66
GND on Top Layer "GND_L01_P008" (solid, pour order 8): -13.4,31.5 -13.4,2 1.4,2 1.9,1.5 19.396,1.5 ccw(c19.396,2.354) 20,1.75 cw(c20.604,1.146) 20.604,2 55.4,2 55.4,31.5 60.4,31.5 60.4,-3 -18.4,-3 -18.4,31.5
GND on Top Layer "GND_L01_P007" (solid, pour order 7): -13.4,31.5 -13.4,61 1.4,61 1.9,61.5 19.396,61.5 cw(c19.396,60.646) 20,61.25 ccw(c20.604,61.854) 20.604,61 55.4,61 55.4,31.5 60.4,31.5 60.4,66 -18.4,66 -18.4,31.5
GND on Top Layer "GND_L01_P012" (solid, pour order 12): 52.4,56.8 52.4,61.3 56.2,61.3 56.2,56.8
GND on Top Solder "GND_L01_P005" (solid, pour order 5): 52.4,56.8 52.4,61.3 56.2,61.3 56.2,56.8
no net on Top Solder "NONET_L01_P004" (solid, pour order 4): -13.4,31.5 -13.4,61 1.4,61 1.9,61.5 19.396,61.5 cw(c19.396,60.646) 20,61.25 ccw(c20.604,61.854) 20.604,61 55.4,61 55.4,31.5 60.4,31.5 60.4,66 -18.4,66 -18.4,31.5
GND on Top Solder "GND_L01_P000" (solid, pour order 0): -13.4,31.5 -13.4,2 1.4,2 1.9,1.5 19.396,1.5 ccw(c19.396,2.354) 20,1.75 cw(c20.604,1.146) 20.604,2 55.4,2 55.4,31.5 60.4,31.5 60.4,-3 -18.4,-3 -18.4,31.5
GND on Bottom Solder "GND_L01_P011" (solid, pour order 11): 52.4,56.8 52.4,61.3 56.2,61.3 56.2,56.8
GND on Bottom Solder "GND_L04_P003" (solid, pour order 3): -13.4,31.5 -13.4,2 1.4,2 20.604,2 55.4,2 55.4,31.5 60.4,31.5 60.4,-3 -18.4,-3 -18.4,31.5
GND on Bottom Solder "GND_L04_P001" (solid, pour order 1): -13.4,31.5 -13.4,61 1.4,61 20.7,61 ccw(c20.652,60.884) 20.604,61 55.4,61 55.4,31.5 60.4,31.5 60.4,66 -18.4,66 -18.4,31.5
FMC_3V3 on Int2 (PWR) (split plane): 42.79,65.289 42.79,63.9 42.79,63.891 42.798,63.768 42.824,63.639 42.867,63.513 42.925,63.395 42.999,63.285 43.086,63.186 43.185,63.099 43.295,63.025 43.413,62.967 43.539,62.924 43.668,62.898 43.791,62.89 43.8,62.89 53.389,62.89 53.59,62.689 53.59,61.8 53.59,61.791 53.598,61.668 53.624,61.539 53.667,61.413 53.725,61.295 53.799,61.185 53.886,61.086 53.985,60.999 54.095,60.925 54.213,60.867 54.339,60.824 54.468,60.798 54.591,60.79 54.6,60.79 59.689,60.79 59.89,60.589 59.89,1.011 59.684,0.806 39,0.81 38.991,0.81 38.868,0.802 38.739,0.776 38.613,0.733 38.495,0.675 38.385,0.601 38.286,0.514 38.199,0.415 38.125,0.305 38.067,0.187 38.024,0.061 37.998,-0.068 37.99,-0.191 37.99,-0.2 37.99,-2.289 37.789,-2.49 -17.689,-2.49 -17.89,-2.289 -17.89,65.289 -17.689,65.49 42.589,65.49
FMC_12V on Int2 (PWR) (split plane): 171 vertices, not listed, extent -13.749,5.151 22.349,59.078
FMC_ADJ_CON_CON2 on Int2 (PWR) (split plane): 21.161,16.973 21.161,16.516 21.064,16.419 20.691,16.419 20.652,16.413 20.631,16.405 20.616,16.398 20.584,16.374 20.443,16.232 20.418,16.201 20.403,16.165 20.398,16.125 20.398,15.708 20.403,15.669 20.418,15.632 20.443,15.601 20.564,15.48 20.564,5.592 20.082,5.11 20.025,5.054 19.479,4.507 17.223,2.251 15.21,2.251 14.651,2.81 14.651,4.937 17.307,7.593 17.331,7.624 17.346,7.661 17.351,7.7 17.351,12.837 19.907,15.393 19.931,15.424 19.946,15.461 19.951,15.5 19.951,16.237 20.857,17.143 20.991,17.143
FMC_ADJ_CON_CON1 on Int2 (PWR) (split plane): 17.793,59.593 18.249,59.137 18.249,49.3 18.254,49.261 18.269,49.224 18.293,49.193 19.049,48.437 19.049,48.3 19.049,48.1 19.049,47.2 19.049,46.363 18.837,46.151 17.963,46.151 14.453,49.661 14.453,59.277 14.924,59.749 17.637,59.749
FMC_ADJ on Int2 (PWR) (split plane): 151 vertices, not listed, extent -11.935,5.15 36.649,59.016
GND on Int1 (GND) (split plane): 42.79,65.289 42.79,63.9 42.79,63.891 42.798,63.768 42.824,63.639 42.867,63.513 42.925,63.395 42.999,63.285 43.086,63.186 43.185,63.099 43.295,63.025 43.413,62.967 43.539,62.924 43.668,62.898 43.791,62.89 43.8,62.89 53.389,62.89 53.59,62.689 53.59,61.8 53.59,61.791 53.598,61.668 53.624,61.539 53.667,61.413 53.725,61.295 53.799,61.185 53.886,61.086 53.985,60.999 54.095,60.925 54.213,60.867 54.339,60.824 54.468,60.798 54.591,60.79 54.6,60.79 59.689,60.79 59.89,60.589 59.89,1.011 59.684,0.806 39,0.81 38.991,0.81 38.868,0.802 38.739,0.776 38.613,0.733 38.495,0.675 38.385,0.601 38.286,0.514 38.199,0.415 38.125,0.305 38.067,0.187 38.024,0.061 37.998,-0.068 37.99,-0.191 37.99,-0.2 37.99,-2.289 37.789,-2.49 -17.689,-2.49 -17.89,-2.289 -17.89,65.289 -17.689,65.49 42.589,65.49

## Other copper
Top Layer:
  text "1" at 53.35,7.85 h0.5 r90
  text "top" at 53.283,6.25 h0.5 r90
Bottom Layer:
  region net FMC_3V3: 24.148,11.876 23.554,11.282 21.518,11.282 21.428,11.372 21.428,11.482 22.027,12.082 22.218,12.082 24.979,12.082
  text "bot" at 53.292,11.875 h0.5 r90
  text "4" at 53.35,10.35 h0.5 r90
Int1 (GND) (plane layer: these items are gaps in the copper):
  text "2" at 53.35,8.45 h0.5 r90
Int2 (PWR) (plane layer: these items are gaps in the copper):
  lines w0.3: -4.515,50.5 -4.6,50.5 ; 13,10.7 13,10.8 ; 14.3,59.338 14.862,59.9 17.7,59.9 18.433,59.167 22.759,59.167 23.102,58.824 23.102,58.002 20.913,55.813 20.913,52.413 20.8,52.3 ; 17.9,59.7 18.4,59.2 18.4,49.3 19.2,48.5 19.2,48.1 ; 19.2,48.3 19.2,47.2 ; 20.132,4.947 20.715,5.529 ; 20.189,5.003 19.586,4.4 17.286,2.1 15.147,2.1 14.5,2.747 14.5,5 ; 20.558,15.7 20.57,15.7 20.715,15.555 20.715,5.529 ; 20.903,52.507 20.903,52.097 22.2,50.8 34.323,50.8 36.8,48.323 36.8,15.889 33.011,12.1 23.867,12.1 22.8,11.033 22.8,7.017 23.4,6.417 23.4,5.4 23,5 22.8,5 ; 22.75,5.003 21.241,5.003 20.715,5.529 ; -5.219,51.119 -5.219,52.679 -6.241,53.7 -12.029,53.7 -13.9,51.829 -13.9,7.65 -11.25,5 14.5,5 ; -5.219,51.119 -4.6,50.5 ; -5.219,51.119 -4.6,50.5 ; -4.6,50.5 -3.811,50.5 -3.393,50.918 -3.393,53.061 -4.329,53.998 -4.329,55.771 -4.1,56 -4.1,56.58 -1.451,59.229 13.729,59.229 14.191,59.229 14.302,59.34 14.302,49.598 17.9,46 18.9,46 19.2,46.3 19.2,47.2 ; 14.5,5 17.2,7.7 17.2,12.9 19.8,15.5 19.8,16.3 20.794,17.294 21.054,17.294 21.312,17.036 21.312,16.453 21.127,16.267 20.691,16.267 20.55,16.125 20.55,15.708 20.702,15.555 22.055,15.555 22.5,16 22.5,17.8 22,18.3 20.63,18.3 18.762,16.432 17,14.67 14.8,12.47 14.8,12.037 14.8,9 12.51,6.71 9.01,6.71 8.49,6.71 -9.535,6.71 -12.086,9.261 -12.086,50.562 -11.586,51.062 -9.362,51.062 -6.945,48.645 -4.942,48.645 -2.755,48.645 -1.865,49.535 -1.865,53.116 -3.37,54.621 -3.37,55.264 -1.577,57.057 11.043,57.057 12.5,55.6 12.5,48.1 16.1,44.5 19.8,44.5 21.115,45.815 21.115,46.485 20.4,47.2 19.2,47.2
  text "3" at 53.35,9.25 h0.5 r90

## Silkscreen, mask and mechanical layers (free items; w line width, h text height)
Top Overlay:
  text "1" at 23.151,42.169 h3 r90
  text "2" at 23.153,12.184 h3 r90
Bottom Overlay:
  text "02.2021" at 54.1,54.9 h1.5 r90
  text "Ver.:A" at 51.8,54.8 h1.5 r90
Top Solder:
  drawing of 125 lines, arcs and shapes, not listed
Mechanical 4:
  the board outline again, w0
Mechanical 6:
  circle w0.1: c1.05,58.7 r0.7
  circle w0.1: c-7.7,6.7 r0.4
  circle w0.1: c-2,4.3 r0.7
  lines w0.1: 52.4,56.8 55.4,56.8 ; 52.4,56.8 55.4,56.8 ; 52.4,56.8 52.4,61 ; 52.4,56.8 52.4,61 ; 52.4,61 -13.4,61 -13.4,2 55.4,2 55.4,56.8 ; -18.4,-2.5 -17.9,-3 38,-3 38.5,-2.5 38.5,-0.2 cw(c39,-0.2) 39,0.3 59.895,0.295 60.4,0.8 60.4,60.8 59.9,61.3 54.6,61.3 cw(c54.6,61.8) 54.1,61.8 54.1,62.9 53.6,63.4 43.8,63.4 cw(c43.8,63.9) 43.3,63.9 43.3,65.5 42.8,66 -17.9,66 -18.4,65.5 -18.4,-2.5
  lines w0.3: 19,4 19,1 58,1 58,5 ; 19,28 19,31 ; 19,34 19,31 ; 19,58 19,61 58,61 58,57 ; 21,5 58,5 ; 21,27 58,27 ; 21,35 58,35 ; 21,57 58,57 ; 19,31 58,31 ; 19,31 58,31 ; 58,5 58,16 58,27 ; 58,27 58,31 ; 58,31 58,35 ; 58,35 58,46 58,57
  text "Pin A1" at -11.3,6.5 h0.5